# Altium PCB PCB3.PcbDoc (part 2 of 2)
Units mm, origin at the board's own origin, x right, y up, seen from the top; angles counter-clockwise.
Board outline 125 x 125 mm, 2 copper layers (Top Layer, Bottom Layer); 180 components, 111 nets, 575 pads, 155 vias.
Unrouted connection lines stored in the file: 143.
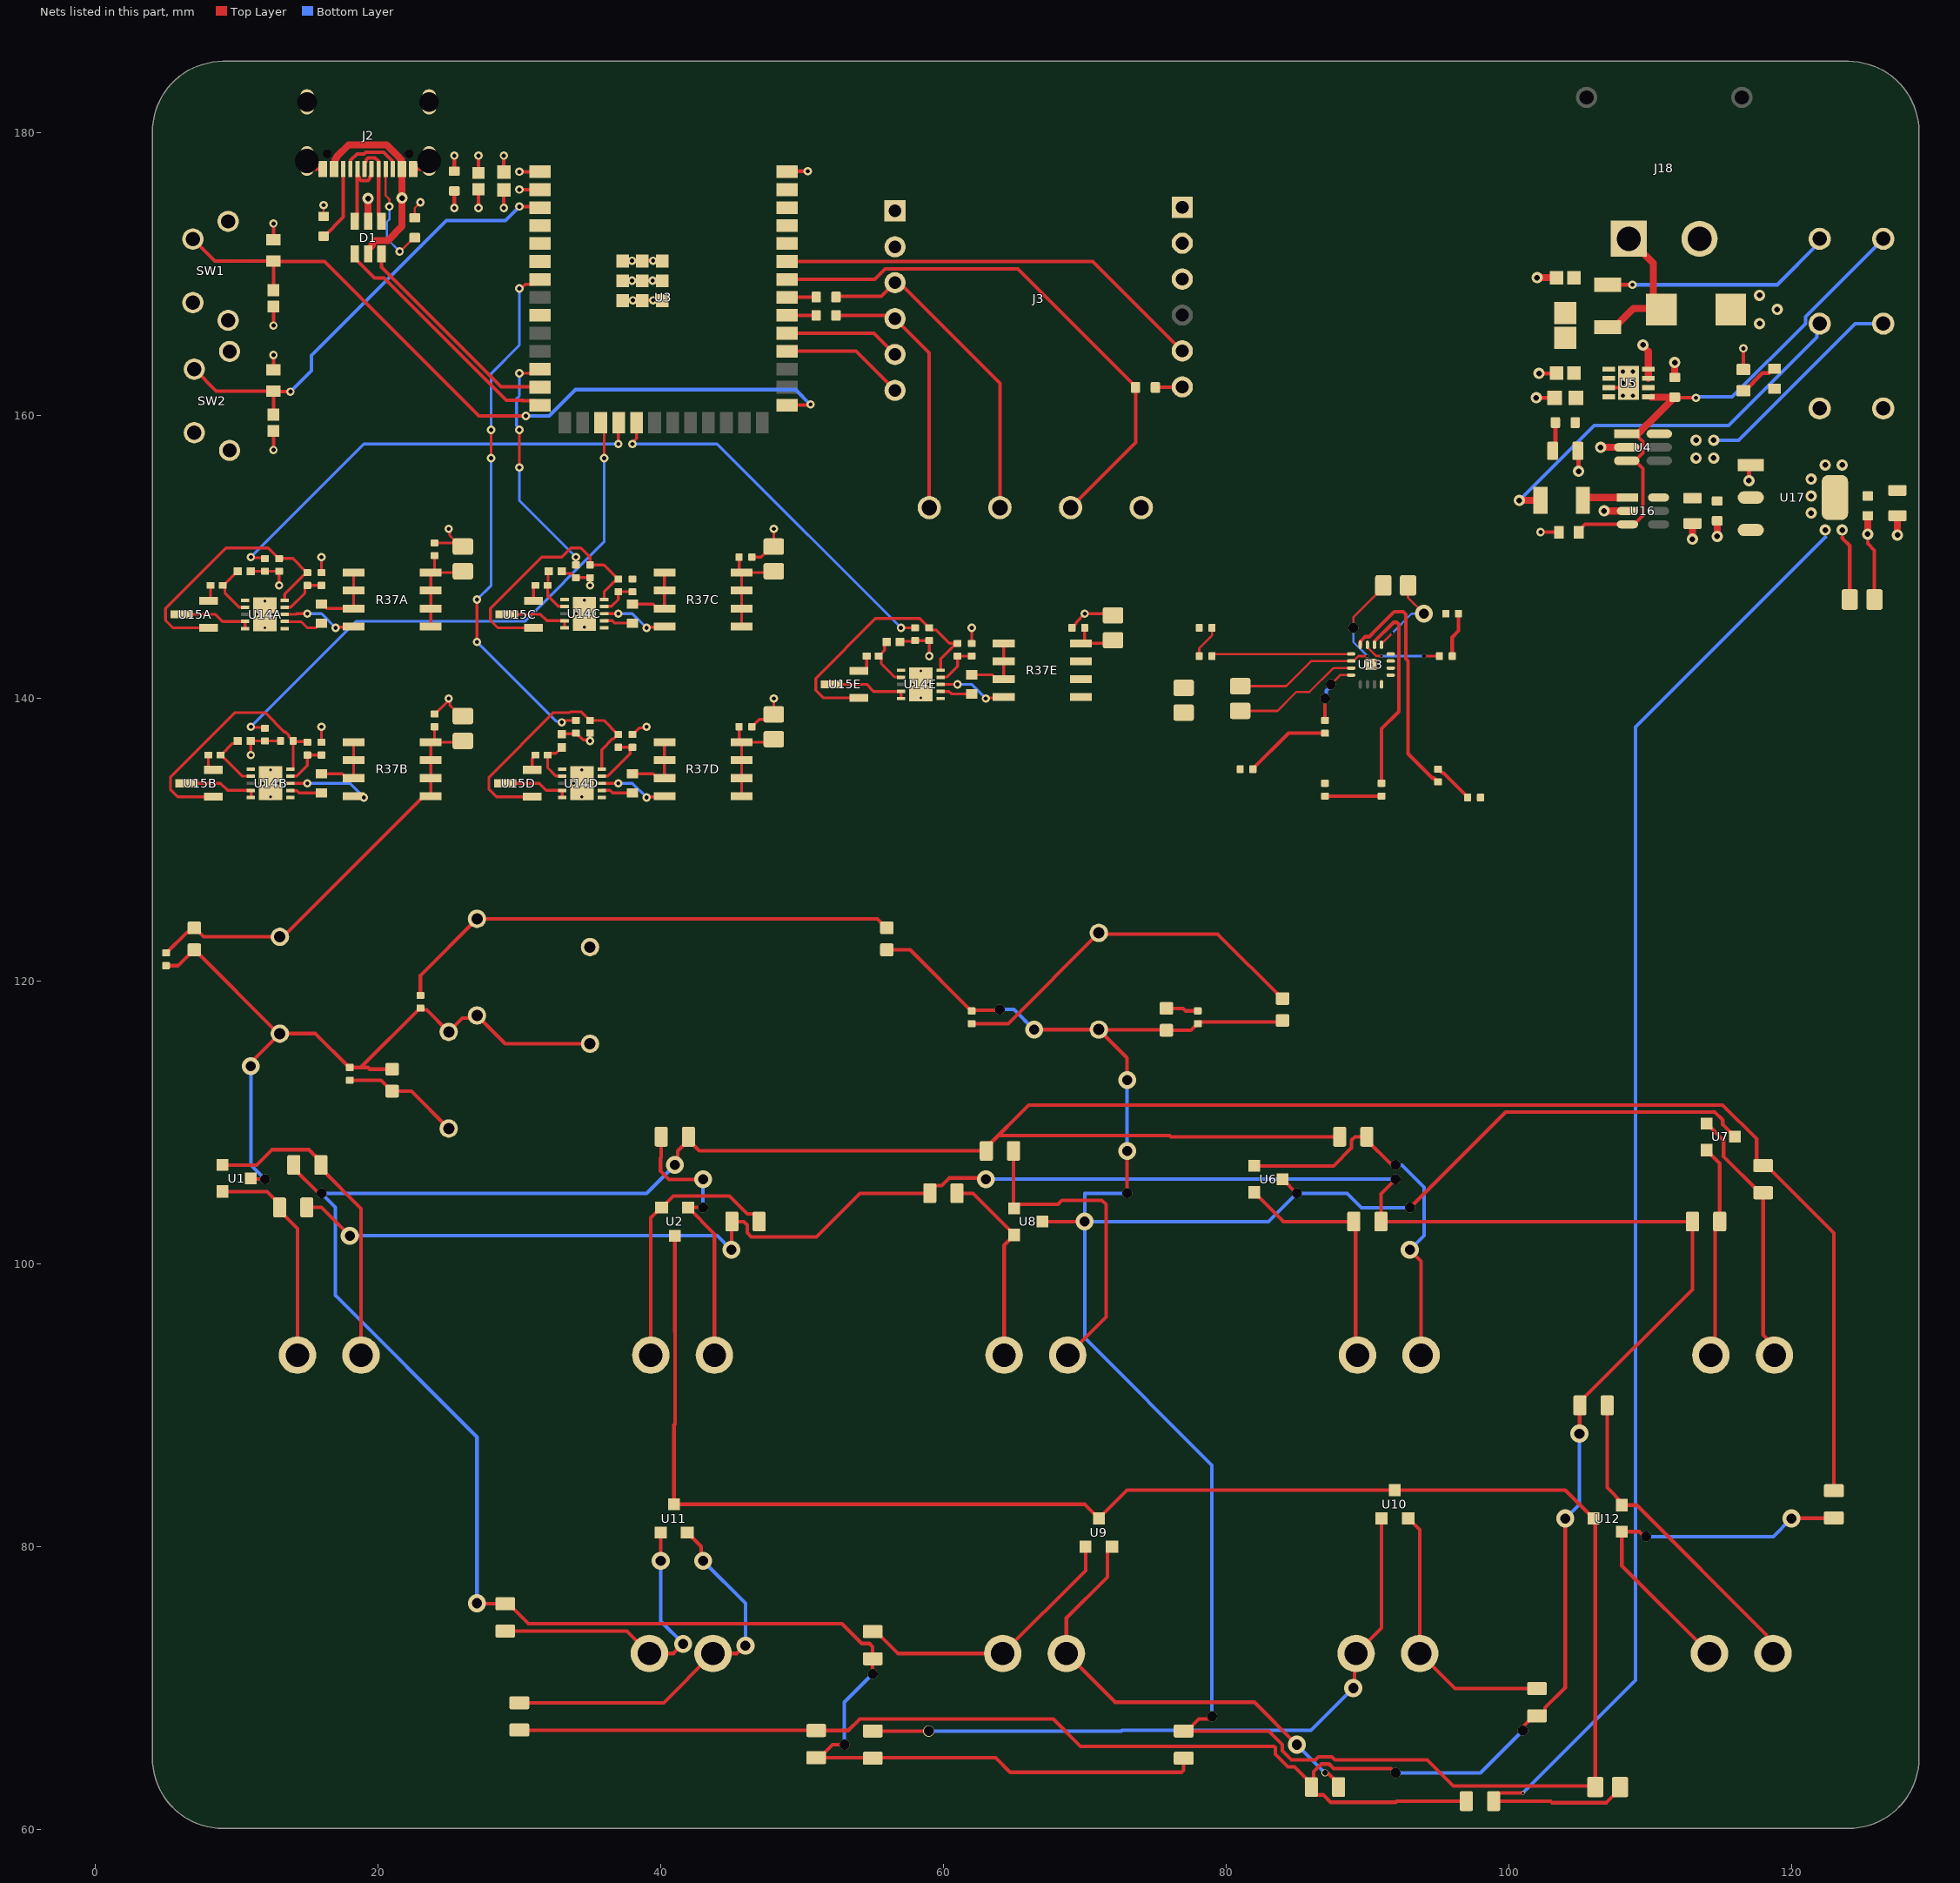
[diagram p2: the nets of this part, all layers, seen from the top]

## Part data (continued)
U17: library part CMP-00015-1, "IC LDO, 3.3V FIXED OUTPUT, 1.3V MAX DROPOUT, 1A", Case/Package=SOP, Dropout Voltage1-Max=1.3V, Dropout Voltage1-Nom=1.2V, Input Voltage Absolute-Max=18V, Max Supply Voltage=15V, Operating Temperature, TJ-Max=125°C, Operating Temperature, TJ-Min=-20°C, Output Current1-Max=800mA, Output Voltage1-Max=3.365V, Output Voltage1-Min=3.235V, Output Voltage1-Nom=3.3V, Package Body Material=Plastic, Package Shape=Rectangular, Voltage Tolerance-Max=1.97%, Adjustability=FIXED, Channels=1, Height - Seated (Max)=1.8mm, JESD-30 Code=R-PDSO-G3, JESD-609 Code=e3, Length=6.5mm, Moisture Sensitivity Level=1, Number of Outputs=1, Packaging="Tape and Reel", Pins=3, Qualification Status="Not Qualified", Reach SVHC Compliant=Yes, Regulator Type="FIXED POSITIVE SINGLE OUTPUT LDO REGULATOR", RoHS Compliant=Yes, Surface Mount=Yes, Technology=BIPOLAR, Terminal Finish=Tin, Terminal Form="Gull Wing", Terminal Pitch=2.3mm, Terminal Position=DUAL, Width=3.5mm

## Via types
v1: diameter 0.6, hole 0.3, Top Layer to Bottom Layer, 71 vias
v2: diameter 1.27, hole 0.711, Top Layer to Bottom Layer, 22 vias
v3: diameter 0.8, hole 0.4, Top Layer to Bottom Layer, 19 vias
v4: diameter 0.711, hole 0.711, Top Layer to Bottom Layer, 18 vias
v5: diameter 0.8/0.8 (per signal layer), hole 0.4, Top Layer to Bottom Layer, 11 vias
v6: diameter 0.45, hole 0.3, Top Layer to Bottom Layer, tented bottom, 6 vias
v7: diameter 0.2, hole 0.2, Top Layer to Bottom Layer, 4 vias
v8: diameter 0.3, hole 0.3, Top Layer to Bottom Layer, 1 vias
v9: diameter 0.25, hole 0.2, Top Layer to Bottom Layer, 1 vias
v10: diameter 0.5, hole 0.4, Top Layer to Bottom Layer, 1 vias
v11: diameter 0.8, hole 0.711, Top Layer to Bottom Layer, 1 vias

## Nets (pads, with @x,y where several pads share a name; then routed paths per layer and width w, separated by ;. In a path a pad name is that pad's centre, name@x,y a point inside that pad or via, vN(x,y) a via of type N, cw(c..) or ccw(c..) an arc to the next point about the centre after c; other vN are vias at no path point)
3.3V: C1.1 C2.2 C3.2 C4.2 C18.1 C31.1 C32.1 J3.10 J3.11 J20.1 R7.2 R17.2 R26.2 R48.1 U3.2 U13.16 U17.2 U17.4 | length 121.8
  Top Layer w0.25: R26.2@12.6,163.25 v1(12.6,164.3) ; R7.2@12.6,172.45 v1(12.6,173.6) ; v1(25.4,174.7) C4.2@25.4,175.9 ; v1(27.1,174.7) C3.2@27.1,176.025 ; v1(28.9,174.7) C2.2@28.9,175.975 ; v1(30,176) 31.445,176 U3.2@31.453,175.993
  Top Layer w0.254: v9(101,62.573) 99.26,62.573 98.925,62.238 R17.2@98.925,62 102.964,62 103.07,61.894 106.919,61.894 107.875,62.85 C1.1@107.875,63 ; 123.6,151.4 123.6,151.345 124.125,150.82 C18.1@124.125,147
  Bottom Layer w0.254: v9(101,62.573) 108.979,70.552 108.979,137.979 122.4,151.4
  other v5: 122.4,151.917 123.6,151.917 121.4,153.117 121.4,154.317 121.4,155.517 122.4,156.517 123.6,156.517
5V: C10.1 C30.1 J17.1 U4.6 U16.6 U17.3 | length 15.4
  Bottom Layer w0.25: v5(114.5,158.267) 116.271,158.267 124.521,166.517 J17.1@126.5,166.517
  other v5: 113.25,157.017 114.5,157.017 113.25,158.267
5V5: C7.1 C8.1 FB1.2 R11.1 U5.5 U5.8
5V5_IN: C6.1 F1.2 FB1.1 J4.1 | length 16.5
  Top Layer w0.25: F1.2@107,169.267 v1(108.75,169.267)
  Bottom Layer w0.25: v1(108.75,169.267) 119,169.267 122,172.267 J4.1@122,172.517
5V_INTER: C19.1 J21.1 R45.1 U4.1 U4.3 U5.1 U16.3 | length 37.9
  Top Layer w0.25: R45.1@104.95,151.767 104.95,151.867 105.4,152.317 108.867,152.317 109.5,152.95 109.5,156.264 U4.3@108.947,156.817 ; U4.3@108.35,156.817 U4.3@108.947,156.817 ; U4.1@108.947,158.717 109.5,158.164 109.5,157.37 U4.3@108.947,156.817 ; C19.1@111.725,161.292 113.225,161.292 v1(113.25,161.267)
  Top Layer w0.5: U4.1@108.35,158.717 109.15,158.717 109.398,158.965 109.398,158.988 109.782,159.372 109.805,159.372 C19.1@111.62,161.187 ; U5.1@110.075,161.317 C19.1@111.75,161.317 ; C19.1@111.688,161.329 C19.1@111.725,161.292
  Bottom Layer w0.25: v1(113.25,161.267) 113.317,161.334 115.809,161.334 120.99,166.514 120.99,167.007 J21.1@126.5,172.517
20mA_1: C20D.1 C23D.1 C24.2 D4.2 R37D.5 R37D.6 R37D.7 R37D.8 R40.2 U3.39 | length 9.6
  Top Layer w0.203: C20D.1@45.55,138 45.55,137.083 45.728,136.905 R37D.8@45.731,136.905 ; R37D.5@45.731,133.095 R37D.6@45.731,134.365 R37D.7@45.731,135.635 R37D.8@45.731,136.905 ; C23D.1@48,137.125 47.78,136.905 R37D.8@45.731,136.905
  Top Layer w0.254: C24.2@75.777,118.08 76.96,118.08 77.14,117.9 R40.2@78,117.9
20mA_2: C20C.1 C23C.1 C27.2 D7.2 R37C.5 R37C.6 R37C.7 R37C.8 R43.2 U3.38 | length 43.6
  Top Layer w0.203: C20C.1@45.55,150 45.55,149.083 45.728,148.905 R37C.8@45.731,148.905 ; R37C.5@45.731,145.095 R37C.6@45.731,146.365 R37C.7@45.731,147.635 R37C.8@45.731,148.905 ; C23C.1@48,149 47.905,148.905 R37C.8@45.731,148.905
  Top Layer w0.254: R43.2@23,119 23,120.42 D7.2@27,124.42 55.33,124.42 55.975,123.775 C27.2@56,123.775
20mA_3: C20B.1 C23B.1 C28.2 D8.2 R37B.5 R37B.6 R37B.7 R37B.8 R44.2 U3.4 | length 31.2
  Top Layer w0.203: R37B.5@23.731,133.095 R37B.6@23.731,134.365 R37B.7@23.731,135.635 R37B.8@23.731,136.905 ; C20B.1@24,138 24,137.083 23.822,136.905 R37B.8@23.731,136.905 ; C23B.1@26,137 25.905,136.905 R37B.8@23.731,136.905
  Top Layer w0.254: R44.2@5,122 5.025,122 6.477,123.452 6.677,123.452 C28.2@7,123.775 7.025,123.775 7.662,123.138 D8.2@13.055,123.138 13.278,123.138 23.235,133.095 R37B.5@23.731,133.095
20mA_4: C20A.1 C23A.1 C25.2 D5.2 R37A.5 R37A.6 R37A.7 R37A.8 R41.2 U3.5 | length 34
  Top Layer w0.203: R37A.5@23.731,145.095 R37A.6@23.731,146.365 R37A.7@23.731,147.635 R37A.8@23.731,148.905 25.905,148.905 C23A.1@26,149 ; R37A.8@23.822,148.905 24,149.083 C20A.1@24,150.1
  Top Layer w0.254: R41.2@62,117 64.58,117 D5.2@71,123.42 71.076,123.344 79.406,123.344 83.975,118.775 C25.2@84,118.775
20mA_5: C20E.1 C23E.1 C26.2 D6.2 R37E.5 R37E.6 R37E.7 R37E.8 R42.2 U3.6 | length 11.6
  Top Layer w0.203: C20E.1@70,145 70,143.905 71.78,143.905 C23E.1@72,144.125
  Top Layer w0.254: R42.2@18,113 20.2,113 20.975,112.225 C26.2@21,112.225 22.355,112.225 D6.2@25,109.58
24V: U14A.1 U14B.1 U14C.1 U14D.1 U14E.1
+5: C21A.1 C21B.1 C21C.1 C21D.1 C21E.1 R36A.1 R36B.1 R36C.1 R36D.1 R36E.1 U14A.5 U14B.5 U14C.5 U14D.5 U14E.5 U15A.1 U15B.1 U15C.1 U15D.1 U15E.1 | length 94.1
  Top Layer w0.203: U15A.1@8.016,145 5.491,145 4.968,145.523 4.968,146.377 9.247,150.656 12.236,150.656 12.631,150.261 12.631,150.244 12.975,149.9 C21A.1@13,149.9 13.975,149.9 14.975,148.9 R36A.1@15,148.9 14.852,148.752 14.76,148.752 13.4,147.391 U14A.5@13.4,146.95 ; U15B.1@8.362,133.05 5.838,133.05 5.314,133.573 5.314,134.427 9.888,139 12,139 13.369,137.631 13.461,137.631 13.706,137.386 13.706,137.294 13.827,137.174 13.852,137.174 14,137.025 C21B.1@14,137 ; U14B.5@13.825,135 13.982,135 14,135.018 C21B.1@14,137 ; R36B.1@15,136.9 14.95,136.95 14.05,136.95 C21B.1@14,137 ; U15D.1@30.899,133.05 28.374,133.05 27.851,133.573 27.851,134.427 32.424,139 33.559,139 33.614,139.056 34.386,139.056 34.827,138.615 34.827,138.598 34.975,138.45 35.975,138.45 R36D.1@36.975,137.45 ; U15C.1@31,145 28.475,145 27.952,145.523 27.952,146.377 31.575,150 33,150 33.656,150.656 34.345,150.656 35,150 C21C.1@35,149.45 35.975,149.45 36.975,148.45 R36C.1@37,148.45 36.852,148.302 36.76,148.302 36,147.541 U14C.5@36,147 ; U14D.5@35.825,135 35.825,136.366 36.614,137.156 36.681,137.156 R36D.1@36.975,137.45 ; R36D.1@37,137.45 R36D.1@36.975,137.45 ; U15E.1@54.016,140.05 51.491,140.05 50.968,140.573 50.968,141.427 55.197,145.655 58.336,145.655 58.63,145.361 58.63,145.344 58.975,145 C21E.1@59,145 59.148,144.852 59.469,144.852 60.421,143.9 R36E.1@61,143.9 60.852,143.752 60.76,143.752 59.8,142.791 U14E.5@59.8,142
+5V: C11.2 C12.2 U13.7 | length 9.1
  Top Layer w0.16: C12.2@81,139.125 83.632,139.125 84.968,140.461 85.9,140.461 87.589,142.15 U13.7@88.85,142.15
BOOT: C5.1 R7.1 SW1.1 U3.27 | length 53.8
  Top Layer w0.25: SW1.1@6.9,172.5 8.45,170.95 R7.1@12.6,170.95 ; C5.1@12.6,168.875 R7.1@12.6,170.95 ; v1(30.462,159.983) 27.13,159.983 16.213,170.9 12.65,170.9 R7.1@12.6,170.95 ; U3.27@48.953,160.753 50.553,160.753 v1(50.6,160.8)
  Bottom Layer w0.25: v1(30.462,159.983) 32.108,159.983 33.975,161.85 49.55,161.85 v1(50.6,160.8)
CS: J3.5 U3.31 | length 8.2
  Top Layer w0.25: U3.31@48.953,165.833 55.083,165.833 J3.5@56.58,164.335
CS_N: U3.9 U13.12
DAC_CH1: C13.2 U14D.6
DAC_CH2: C14.2 U14C.6
DAC_CH3: C15.2 U14B.6
DAC_CH4: C16.2 U14A.6
DAC_CH5: C17.2 U14E.6
EN: C29.1 R26.1 SW2.1 U3.3 | length 32.9
  Top Layer w0.25: SW2.1@7,163.3 8.55,161.75 R26.1@12.6,161.75 ; C29.1@12.6,160.075 R26.1@12.6,161.75 ; v1(13.8,161.7) 12.65,161.7 R26.1@12.6,161.75 ; v1(30,174.8) 31.375,174.8 U3.3@31.453,174.723
  Bottom Layer w0.25: v1(13.8,161.7) 15.3,163.2 15.3,164.275 24.825,173.8 29,173.8 v1(30,174.8)
GND: C1.2 C2.1 C3.1 C4.1 C5.2 C6.2 C7.2 C8.2 C9.2 C10.2 C11.1 C12.1 C18.2 C19.2 C20A.2 C20B.2 C20C.2 C20D.2 C20E.2 C21A.2 C21B.2 C21C.2 C21D.2 C21E.2 C22.2 C23A.2 C23B.2 C23C.2 C23D.2 C23E.2 C24.1 C25.1 C26.1 C27.1 C28.1 C29.2 C30.2 C31.2 C32.2 D1.2 D2.2 D3.K D4.1 D5.1 D6.1 D7.1 D8.1 J2.1 J2.2 J2.3 J2.4 J2.A1-B12 J2.B1-A12 J3.1 J3.2 J3.12 J14.1 J18.N J22.1 R8.2 R9.2 R27.2 R33A.1 R33B.1 R33C.1 R33D.1 R33E.1 R35A.2 R35B.2 R35C.2 R35D.2 R35E.2 R38A.2 R38B.2 R38C.2 R38D.2 R38E.2 R40.1 R41.1 R42.1 R43.1 R44.1 R45.2 SW1.2 SW1.G1 SW1.G2 SW2.2 SW2.G1 SW2.G2 U1.3 U2.3 U3.GND U4.2 U5.2 U5.3 U5.4 U5.6 U5.7 U5.9 U6.3 U7.3 U8.3 U9.3 U10.3 U11.3 U12.3 U13.6 U13.17 U14A.9 U14A.10 U14A.11 U14B.9 U14B.10 U14B.11 U14C.9 U14C.10 U14C.11 U14D.9 U14D.10 U14D.11 U14E.9 U14E.10 U14E.11 U15A.3 U15B.3 U15C.3 U15D.3 U15E.3 U16.2 U17.1 | length 459.3
  Top Layer w0.15: R9.2@16.15,174.1 v1(16.15,174.9) ; R8.2@22.6,174 22.6,174.7 v1(23,175.1)
  Top Layer w0.16: C12.1@81,140.875 84.257,140.875 86.032,142.65 U13.6@88.85,142.65 89.03,142.65 89.38,143 v7(90,143) ; v4(89,145) 89,145.725 91.125,147.85 C22.2@91.125,148
  Top Layer w0.203: U15A.3@6.117,145.95 8.509,145.95 9.009,145.45 U14A.9@10.6,145.45 U14A.10@10.6,144.95 ; U15B.3@7.156,134.156 7,134 8.855,134 9.355,133.5 11.025,133.5 U14B.10@11.025,133 ; v1(11,136) 11,136.992 10.992,137 R33B.1@12,137 C21B.2@13.1,137 ; R35A.2@11,149 R33A.1@12,149 C21A.2@13,149 v1(13,148) ; U14B.11@12.425,134 U14B.11@12.425,134.375 ; R38B.2@16,136.9 v1(16,138) ; R38A.2@16,148.9 v1(16,150) ; C20B.2@24,138.9 24.025,138.9 24.924,139.799 24.924,139.924 v1(25,140) 25.076,139.924 25.076,139.524 25.85,138.75 C23B.2@26,138.75 ; C20A.2@24,151 25.6,151 C23A.2@25.85,150.75 ; v1(25,152) 25.076,151.924 25.076,151.524 C23A.2@25.85,150.75 ; C23A.2@26,150.75 C23A.2@25.85,150.75 ; U15D.3@29,134 31.391,134 31.891,133.5 U14D.9@33.025,133.5 U14D.10@33.025,133 ; U15C.3@29.101,145.95 31.493,145.95 31.943,145.5 U14C.9@33.2,145.5 U14C.10@33.2,145 ; R35D.2@33,137.464 33.043,137.507 33.957,137.507 R33D.1@34,137.55 34.025,137.55 34.499,137.076 34.924,137.076 v1(35,137) C21D.2@35,137.55 ; R35C.2@33,149 33.156,148.844 33.681,148.844 33.975,148.55 R33C.1@34,148.55 C21C.2@35,148.55 v1(35,148) ; U14D.11@34.425,134 34.425,134.281 34.488,134.345 34.676,134.345 35.031,134.699 U14D.11@35.031,135 ; R38D.2@38,137.45 38.025,137.45 38.499,137.924 38.924,137.924 v1(39,138) ; C20D.2@46.45,138 46.45,138.025 46.598,138.174 46.623,138.174 46.971,138.521 47.646,138.521 C23D.2@48,138.875 v1(48,140) ; C20C.2@46.45,150 47.1,150 47.85,150.75 C23C.2@48,150.75 v1(48,152) ; U15E.3@52.117,141 54.565,141 55.065,140.5 U14E.9@57,140.5 U14E.10@57,140 ; R35E.2@56.928,144 56.978,144.05 57.95,144.05 R33E.1@58,144.1 C21E.2@59,144.1 v1@59,143.1 ; R38E.2@62,143.9 v1(62,145) ; C20E.2@69.1,145 69.1,145.025 69.394,145.319 69.394,145.394 v1(70,146) 71.875,146 C23E.2@72,145.875
  Top Layer w0.25: v1(12.6,157.58) C29.2@12.6,158.925 ; v1(12.6,166.38) C5.2@12.6,167.725 ; J2.2@14.975,178.02 14.975,177.791 15.321,177.445 J2.B1-A12@16.095,177.445 J2.B1-A12@16.097,177.443 ; R9.2@16.125,174.125 R9.2@16.15,174.1 ; J2.A1-B12@22.548,177.392 J2.A1-B12@22.495,177.445 23.269,177.445 23.615,177.791 J2.1@23.615,178.02 ; C4.1@25.4,177.3 v1(25.4,178.4) ; C3.1@27.1,177.175 v1(27.1,178.4) ; C2.1@28.9,177.225 v1(28.9,178.4) ; v1(30.003,177.263) U3.GND@31.453,177.263 ; U3.GND@37.303,168.143 37.325,168.165 v1(38.035,168.165) ; U3.GND@37.303,169.543 37.325,169.565 v1(37.965,169.565) ; U3.GND@37.303,170.943 37.325,170.965 v1(37.965,170.965) ; U3.GND@38.703,168.143 38.725,168.165 v1(39.465,168.165) ; U3.GND@38.703,169.543 38.725,169.565 v1(39.435,169.565) ; U3.GND@38.703,170.943 38.725,170.965 v1(39.465,170.965) ; U3.GND@48.953,177.263 48.99,177.3 v1(50.4,177.3) ; v1(102.25,151.767) R45.2@103.55,151.767 ; U5.7@107.085,161.992 107.86,161.992 108.08,162.212 v6(108.08,162.317) ; D3.K@116.6,163.267 v1(116.6,164.767)
  Top Layer w0.254: R44.1@5,121.1 5.85,121.1 6.975,122.225 C28.1@7,122.225 7.025,122.225 12.952,116.298 D8.1@13.055,116.298 ; U1.3@11,106.06 11.06,106 v4(12,106) ; v2@11,114.243 D8.1@13.055,116.298 ; C26.1@21,113.775 19.401,113.775 19.276,113.9 18.775,113.9 ; D4.1@35,115.58 29,115.58 D7.1@27,117.58 26.809,117.389 25.969,117.389 D6.1@25,116.42 23.443,117.977 23.123,117.977 R43.1@23,118.1 22.975,118.1 18.775,113.9 ; U2.3@41,102 41,95.198 41.006,95.192 41.006,88.683 40.94,88.617 U11.3@40.94,83 70,83 U9.3@71,82 73,84 U10.3@91.94,84 104,84 U12.3@106,82 106.125,81.875 C1.2@106.125,63 106.044,63.081 96.08,63.081 94.231,64.931 87.706,64.931 87.498,65.139 86.528,65.139 86.32,64.931 84.633,64.931 83.984,65.579 83.984,66.009 83.031,66.963 R27.2@77.238,66.963 ; C27.1@56,122.225 57.65,122.225 61.975,117.9 R41.1@62,117.9 62.05,117.95 63.95,117.95 v4(64,118) ; v2(66.42,116.58) D5.1@71,116.58 ; U8.3@67,103 v2(70,103) ; v4(73,105) v2(73,108) ; v2(73,113) 73,114.58 D5.1@71,116.58 ; R27.2@77,66.963 R27.2@77.238,66.963 ; v4(79,68) 78.806,67.806 78.081,67.806 R27.2@77.238,66.963 ; U6.3@84,106 v4(85,105) ; C25.1@84,117.225 83.888,117.113 78.113,117.113 R40.1@78,117 77.975,117 77.505,116.53 C24.1@75.777,116.53 75.752,116.555 71.025,116.555 D5.1@71,116.58 ; v4(93,104) 93.042,104 99.783,110.741 114.578,110.741 115.142,110.176 115.142,109.858 U7.3@116,109 ; 125.403,151.109 125.403,150.961 125.875,150.489 C18.2@125.875,147 ; D8.1@13.055,116.298 15.577,116.298 17.975,113.9 18.775,113.9
  Top Layer w0.3: v3(101.95,161.267) C8.2@103.25,161.267 ; v3(102.15,162.992) 103.35,162.992 C7.2@103.375,163.017 ; C9.2@104.89,157.517 104.945,157.462 v3(104.945,156.072) ; D2.2@115.7,167.517 D2.2@115.8,167.417 ; v3(117,155.417) 117,156.393 U17.1@117.124,156.517
  Top Layer w0.5: D1.2@19.3,173.75 v3(19.3,175.375) ; v3(102,169.767) C6.2@103.375,169.767 ; v3(106.5,157.767) U4.2@108.35,157.767 ; v3(106.75,153.267) U16.2@108.4,153.267 ; v3(109.5,165.017) 109.5,164.936 109.875,164.561 U5.4@109.875,163.292 U5.3@109.875,162.642 ; C19.2@111.75,162.717 v3(111.75,163.767) ; v3(113,151.267) C10.2@113,152.377 ; v3(114.75,151.467) C30.2@114.75,152.567 ; v3(125.403,151.626) C31.2@125.403,152.926 ; v3(127.5,151.567) C32.2@127.5,152.927
  Bottom Layer w0.16: v4(89,145) 89,144 v7(90,143)
  Bottom Layer w0.254: v2(11,114) 11,107 v4(12,106) ; v4(64,118) 65,118 v2(66.42,116.58) ; v4(73,105) 70,105 v2(70,103) ; v2(73,108) v2(73,113) ; v4(79,68) 79,85.763 70,94.763 v2(70,103) ; v4@93,103.984 89.57,103.984 88.554,105 v4(85,105) 83,103 v2(70,103)
  other v1: 59,143
  other v3: 117.75,166.517 119,167.517 117.75,168.517
  other v6: 108.08,161.417 108.78,161.417 108.78,162.317 108.08,163.117 108.78,163.117
GPIO07: R33D.2 U3.7 | length 37.4
  Top Layer w0.203: v1(27,144) v1(27,147) ; v1(28,157) v1(28,159) ; v1(30,169) 30.107,169 30.401,169.294 31.104,169.294 U3.7@31.453,169.643 ; v1(33,138.312) 33.107,138.312 33.246,138.45 R33D.2@34,138.45
  Bottom Layer w0.203: v1(27,144) 32.612,138.388 32.924,138.388 v1(33,138.312) ; v1(27,147) 28,148 v1(28,157) ; v1(28,159) 28,163 30,165 v1(30,169)
GPIO08: R33C.2 U3.12 | length 16.9
  Top Layer w0.203: v1(30,156.345) v1(30,159) ; v1(30,163) 31.16,163 U3.12@31.453,163.293 ; R33C.2@34,149.45 v1(34,150)
  Bottom Layer w0.203: v1(30,156.345) 30,154 v1(34,150) ; v1(30,159) 30,159.107 29.807,159.301 29.807,161.205 30,161.399 v1(30,163)
GPIO09: R33B.2 U3.17 | length 40
  Top Layer w0.203: v1(11,138) 11.05,137.95 11.95,137.95 R33B.2@12,137.9 ; U3.17@35.758,159.503 36,159.26 v1(36,157)
  Bottom Layer w0.203: v1(11,138) 18.457,145.457 30.384,145.457 36,151.073 v1(36,157)
GPIO10: R33A.2 U3.18 | length 31.9
  Top Layer w0.203: v1(11,150) 11.05,149.95 11.95,149.95 R33A.2@12,149.9 ; v1(37,158) 37,159.475 U3.18@37.028,159.503
  Bottom Layer w0.203: v1(11,150) 19,158 v1(37,158)
GPIO11: R33E.2 U3.19 | length 27
  Top Layer w0.203: v1(38,158) 38,158.107 38.298,158.405 U3.19@38.298,159.503 ; v1(57,145) R33E.2@58,145
  Bottom Layer w0.203: v1(38,158) 44,158 v1(57,145)
INT: J3.6 U3.30 | length 8.8
  Top Layer w0.25: U3.30@48.953,164.563 53.813,164.563 J3.6@56.58,161.795
MISO: J15.1 R47.2 U3.34 U13.15 | length 38.9
  Top Layer w0.25: U3.34@48.953,169.643 55.143,169.643 55.89,170.39 65.26,170.39 73.6,162.05 R47.2@73.6,162 73.6,158.1 J15.1@69,153.5
MOSI: J3.3 J13.1 R46.1 U13.14 | length 23.8
  Top Layer w0.25: R46.1@52.4,168.4 52.45,168.45 55.615,168.45 J3.3@56.58,169.415 56.885,169.415 64,162.3 J13.1@64,153.5
NetC9_1: C9.1 R11.2 | length 2.1
  Top Layer w0.3: C9.1@103.1,157.517 103.3,157.717 R11.2@103.3,159.517
NetC13_1: C13.1 R28.2 | length 4
  Top Layer w0.254: C13.1@87,133.1 90.9,133.1 R28.2@90.95,133.05
NetC14_1: C14.1 R29.2 | length 3.2
  Top Layer w0.254: R29.2@96,143 96,144.337 96.45,144.787 C14.1@96.45,146
NetC15_1: C15.1 R30.2 | length 2.9
  Top Layer w0.254: R30.2@95,135 95.025,135 95.294,134.731 95.396,134.731 96.977,133.15 96.977,133.123 C15.1@97.1,133
NetC16_1: C16.1 R31.2 | length 2.4
  Top Layer w0.16: R31.2@78.1,143 78.1,143.55 79,144.45 C16.1@79,145
NetC17_1: C17.1 R32.2 | length 6.2
  Top Layer w0.254: C17.1@81.9,135 81.9,135.025 84.425,137.55 R32.2@87,137.55
NetC22_1: C22.1 U13.1 | length 6.4
  Top Layer w0.16: U13.1@91,143.8 91,143.875 v7(91.756,144.631) ; C22.1@92.875,148 92.875,147.125 v2(94,146)
  Bottom Layer w0.16: v7(91.756,144.631) 93.125,146 v2(94,146)
NetCR1_1: U3.36
NetCR1_4: U3.37
NetD2_1: D2.1 F1.1 J18.P | length 10
  Top Layer w0.5: F1.1@107,166.267 107.25,166.517 107.75,166.517 108.813,167.58 D2.1@110.5,167.58 ; J18.P@108.5,172.517 110.229,170.787 110.229,168.087 110.619,167.698 D2.1@110.8,167.517
NetD3_A: D3.A R48.2 | length 2.8
  Top Layer w0.3: D3.A@116.6,161.767 116.7,161.767 117.95,163.017 118.4,163.017 118.7,163.317 R48.2@118.8,163.317
NetF2_2: F2.2 U16.1 | length 3.2
  Top Layer w0.5: F2.2@105.25,154.017 105.45,154.217 U16.1@108.4,154.217
NetJ1_1: J1.1 R1.2 U1.2 | length 15.6
  Top Layer w0.254: U1.2@9,105.12 12.155,105.12 13.037,104.238 R1.2@13.037,104 13.037,103.763 14.3,102.5 J1.1@14.3,93.55
NetJ1_2: J1.2 R4.2 U1.1 | length 22.6
  Top Layer w0.254: U1.1@9,107 11.401,107 12.482,108.081 15.119,108.081 15.963,107.237 R4.2@15.963,107 15.963,106.762 18.8,103.925 J1.2@18.8,93.55
NetJ2_A5: J2.A5 R8.1 | length 7.8
  Top Layer w0.15: J2.A5@20.545,177.445 20.545,175.577 20.8,175.322 v1(20.8,174.8) ; v1(21.525,171.625) 21.571,171.625 22.546,172.6 R8.1@22.6,172.6
  Bottom Layer w0.15: v1(20.8,174.8) 20.8,173.889 20.625,173.714 20.625,172.525 v1(21.525,171.625)
NetJ2_B5: J2.B5 R9.1 | length 5.4
  Top Layer w0.25: R9.1@16.15,172.7 16.2,172.7 17.545,174.045 J2.B5@17.545,177.445
NetJ3_7: J3.7 R47.1 | length 1.9
  Top Layer w0.25: R47.1@75,162 75.023,162.022 76.877,162.022 J3.7@76.9,162.045
NetJ5_1: J5.1 R2.2 U2.2 | length 18.9
  Top Layer w0.254: J5.1@39.3,93.55 39.3,103.27 40.03,104 U2.2@40.06,104 40.09,104 40.891,104.801 44.87,104.801 46.119,103.552 46.627,103.552 46.962,103.217 R2.2@46.962,103
NetJ5_2: J5.2 R5.2 U2.1 | length 20
  Top Layer w0.254: R5.2@40.037,109 40.037,107.53 39.984,107.476 39.984,106.579 40.579,105.984 42.984,105.984 v2(43,106) ; v4(43,104) U2.1@41.94,104 43.8,102.14 J5.2@43.8,93.55
  Bottom Layer w0.254: v4(43,104) 42.984,104.016 42.984,105.984 v2(43,106)
NetJ6_1: J6.1 R3.2 U8.2 | length 14.1
  Top Layer w0.254: R3.2@60.962,105 62.09,105 65,102.09 U8.2@65,102.06 65,102.03 64.3,101.33 J6.1@64.3,93.55
NetJ6_2: J6.2 R6.2 U8.1 | length 22.7
  Top Layer w0.254: R6.2@64.962,108 64.962,103.978 U8.1@65,103.94 65.293,104.233 68.114,104.233 68.389,104.508 71.21,104.508 71.508,104.21 71.508,96.258 J6.2@68.8,93.55
NetJ7_1: J7.1 R12.2 U6.2 | length 17.5
  Top Layer w0.254: U6.2@82,105.06 82,105.03 82.293,104.737 82.323,104.737 84.06,103 R12.2@89.038,103 89.169,102.869 89.169,93.681 J7.1@89.3,93.55
NetJ7_2: J7.2 R15.2 U6.1 | length 27.4
  Top Layer w0.254: U6.1@82,106.94 87.611,106.94 88.881,108.21 88.881,108.762 89.119,109 R15.2@89.962,109 89.962,108.763 91.638,107.087 91.913,107.087 v4(92,107) ; v2(93,101) 93.8,100.2 J7.2@93.8,93.55
  Bottom Layer w0.254: v4(92,107) 92.437,107 94.016,105.421 94.016,102.016 v2(93,101)
NetJ8_1: J8.1 R13.2 U7.2 | length 15.2
  Top Layer w0.254: U7.2@114,108.06 114,108.03 114.925,107.105 R13.2@114.925,103 114.612,102.687 114.612,93.862 J8.1@114.3,93.55
NetJ8_2: J8.2 R16.2 U7.1 | length 18.5
  Top Layer w0.254: U7.1@114,109.94 115.199,108.741 115.199,107.601 117.763,105.037 R16.2@118,105.037 118,94.998 118.8,94.198 J8.2@118.8,93.55
NetJ9_1: J9.1 R14.2 U12.2 | length 23
  Top Layer w0.254: R14.2@106.962,90 106.962,84.188 U12.2@108.09,83.06 ; U12.2@108,82.94 108.09,82.94 109.06,82.94 118.242,73.758 118.242,72.908 J9.1@118.7,72.45
NetJ9_2: J9.2 R25.2 U12.1 | length 26.9
  Top Layer w0.254: v4(109.716,80.716) 109.592,80.716 109.248,81.06 U12.1@108,81.06 108,78.65 J9.2@114.2,72.45 ; v2(120,82) 120.019,82.019 122.981,82.019 R25.2@123,82.037
  Bottom Layer w0.254: v4(109.716,80.716) 118.716,80.716 v2(120,82)
NetJ10_1: J10.1 R18.2 U10.2 | length 19.2
  Top Layer w0.254: U10.2@92.88,82 92.91,82 93.7,81.21 J10.1@93.7,72.45 96.188,69.962 R18.2@102,69.962
NetJ10_2: J10.2 R22.2 U10.1 | length 48.1
  Top Layer w0.254: R22.2@55,66.963 v11(58.962,66.963) v11@59,67 ; v2(89,70) 89.1,70.1 89.1,72.35 J10.2@89.2,72.45 91,74.25 U10.1@91,82
  Bottom Layer w0.254: v11(58.962,66.963) 72.589,66.963 72.642,67.016 86.016,67.016 v2(89,70)
NetJ11_1: J11.1 R19.2 U9.2 | length 32.2
  Top Layer w0.254: U9.2@71.94,80 71.91,80 71.617,79.707 71.617,77.861 68.7,74.944 J11.1@68.7,72.45 72.15,69 82,69 v2(85,66) ; v10(87,64) 87.047,63.953 87.247,63.953 87.963,63.238 R19.2@87.963,63
  Bottom Layer w0.254: v2(85,66) v10(87,64)
NetJ11_2: J11.2 R23.2 U9.1 | length 19.8
  Top Layer w0.254: R23.2@55,74 55.237,74 56.787,72.45 J11.2@64.2,72.45 70.06,78.31 U9.1@70.06,80
NetJ12_1: J12.1 R20.2 U11.2 | length 27.4
  Top Layer w0.254: R20.2@30,68.963 40.213,68.963 J12.1@43.7,72.45 45.382,72.45 45.932,73 v2(46,73) ; U11.2@41.88,81 41.91,81 42.203,80.707 42.203,80.677 42.864,80.016 42.864,79.136 v2(43,79)
  Bottom Layer w0.254: v2(43,79) 46,76 v2(46,73)
NetJ12_2: J12.2 R24.2 U11.1 | length 22.3
  Top Layer w0.254: R24.2@29,74.037 37.613,74.037 J12.2@39.2,72.45 40.906,72.45 v2@41.588,73.132 ; v2(40,79) U11.1@40,81 ; v2@41.319,73.132 v2@41.588,73.132 ; v2(41.594,73.132) v2@41.588,73.132
  Bottom Layer w0.254: v2(40,79) 40,74.725 v2(41.594,73.132)
NetR10_2: R10.2 U3.32 | length 2
  Top Layer w0.25: U3.32@48.953,167.103 48.955,167.1 R10.2@51,167.1
NetR28_1: R28.1 U13.2 | length 14.3
  Top Layer w0.254: U13.2@90.5,143.8 90.507,143.807 90.507,144.034 91.858,145.385 92.068,145.385 92.217,145.236 92.217,139.075 91,137.858 R28.1@91,134
NetR29_1: R29.1 U13.3 | length 5.5
  Top Layer w0.16: U13.3@90,143.8 90,143.62 90.6,143.02 90.741,143.02 90.761,143 v7(91,143) ; v8(94,143) R29.1@95.1,143
  Bottom Layer w0.16: v7(91,143) v8(94,143)
NetR30_1: R30.1 U13.4 | length 17.3
  Top Layer w0.254: U13.4@89.5,143.8 89.507,143.807 89.507,144.034 89.84,144.367 90.121,144.367 90.629,144.875 91.901,146.147 92.533,146.147 92.725,145.955 92.725,143.521 92.725,142.802 92.882,142.645 92.882,136.091 94.604,134.369 94.706,134.369 94.975,134.1 R30.1@95,134.1
NetR31_1: R31.1 U13.5 | length 9.9
  Top Layer w0.16: R31.1@79,143 79.135,143.135 88.835,143.135 U13.5@88.85,143.15
NetR32_1: R32.1 U13.8 | length 4.4
  Top Layer w0.16: v4(87.414,141) 88.064,141.65 U13.8@88.85,141.65
  Top Layer w0.254: R32.1@87,138.45 v4(87,140)
  Bottom Layer w0.254: v4(87,140) 87.087,140.087 87.087,140.55 87.414,140.876 v4(87.414,141)
NetR34A_1: R34A.1 U14A.2 | length 2.9
  Top Layer w0.203: U14A.2@13.4,145.45 13.418,145.431 14.569,145.431 15,145 15.6,145 15.923,145.323 R34A.1@16,145.323
NetR34A_2: R34A.2 R37A.1 R37A.2 R37A.3 | length 4.9
  Top Layer w0.203: R34A.2@16,146.677 16.077,146.677 16.388,146.365 R37A.3@18.27,146.365 R37A.2@18.27,147.635 R37A.1@18.27,148.905
NetR34B_1: R34B.1 U14B.2 | length 2.2
  Top Layer w0.203: U14B.2@13.825,133.5 13.843,133.482 14.223,133.482 14.229,133.476 14.272,133.476 14.424,133.323 R34B.1@16,133.323
NetR34B_2: R34B.2 R37B.1 R37B.2 R37B.3 | length 4.9
  Top Layer w0.203: R34B.2@16,134.677 17.462,134.677 17.774,134.365 R37B.3@18.27,134.365 R37B.2@18.27,135.635 R37B.1@18.27,136.905
NetR34C_1: R34C.1 U14C.2 | length 2.1
  Top Layer w0.203: U14C.2@36,145.5 36.573,145.5 36.728,145.344 37.979,145.344 R34C.1@38,145.323
NetR34C_2: R34C.2 R37C.1 R37C.2 R37C.3 | length 4.9
  Top Layer w0.203: R34C.2@38,146.677 39.462,146.677 39.774,146.365 R37C.3@40.27,146.365 R37C.2@40.27,147.635 R37C.1@40.27,148.905
NetR34D_1: R34D.1 U14D.2 | length 2.2
  Top Layer w0.203: U14D.2@35.825,133.5 36.429,133.5 36.606,133.323 R34D.1@38,133.323
NetR34D_2: R34D.2 R37D.1 R37D.2 R37D.3 | length 4.9
  Top Layer w0.203: R34D.2@38,134.677 39.462,134.677 39.774,134.365 R37D.3@40.27,134.365 R37D.2@40.27,135.635 R37D.1@40.27,136.905
NetR34E_1: R34E.1 U14E.2 | length 2.3
  Top Layer w0.203: U14E.2@59.8,140.5 60.404,140.5 60.581,140.323 R34E.1@62,140.323
NetR34E_2: R34E.2 R37E.1 R37E.2 R37E.3 | length 4.9
  Top Layer w0.203: R34E.2@62,141.677 63.462,141.677 63.774,141.365 R37E.3@64.269,141.365 R37E.2@64.269,142.635 R37E.1@64.269,143.905
NetR35A_1: R35A.1 R39A.2 U14A.7 | length 3.9
  Top Layer w0.203: R39A.2@9,148 9.033,148 9.168,147.865 9.168,147.459 10.159,146.468 10.582,146.468 U14A.7@10.6,146.45 ; R39A.2@9.044,148 9.859,148.815 9.887,148.815 R35A.1@10.072,149
NetR35B_1: R35B.1 R39B.2 U14B.7 | length 4.4
  Top Layer w0.203: R39B.2@8.852,136 R39B.2@8.896,136 ; R35B.1@10.072,137 9.887,136.815 9.711,136.815 R39B.2@8.896,136 ; U14B.7@11.025,134.5 10.396,134.5 R39B.2@8.896,136
NetR35C_1: R35C.1 R39C.2 U14C.7 | length 3.3
  Top Layer w0.203: R35C.1@32.072,149 32.036,148.964 32.036,148.036 R39C.2@32,148 32,147.545 32.016,147.529 32.016,147.261 32.759,146.518 33.182,146.518 U14C.7@33.2,146.5
NetR35D_1: R35D.1 R39D.2 U14D.7 | length 3.4
  Top Layer w0.203: R35D.1@33,136.536 33,136.528 32.584,136.113 32.113,136.113 R39D.2@32,136 32,135.102 32.584,134.518 33.007,134.518 U14D.7@33.025,134.5
NetR35E_1: R35E.1 R39E.2 U14E.7 | length 3.6
  Top Layer w0.203: R39E.2@55.426,143 R39E.2@55.47,143 ; R35E.1@56,144 55.836,143.836 55.836,143.409 55.605,143.178 55.605,143.135 R39E.2@55.47,143 ; U14E.7@57,141.5 56.981,141.518 56.559,141.518 55.605,142.473 55.605,142.865 R39E.2@55.47,143
NetR36A_2: R36A.2 R38A.1 U14A.4 | length 3.5
  Top Layer w0.203: U14A.4@13.4,146.45 13.418,146.468 13.841,146.468 14.827,147.454 14.827,147.852 14.975,148 R36A.2@15,148 R38A.1@16,148
NetR36B_2: R36B.2 R38B.1 U14B.4 | length 3.2
  Top Layer w0.203: U14B.4@13.825,134.5 13.843,134.518 14.266,134.518 15,135.252 R36B.2@15,136 R38B.1@16,136
NetR36C_2: R36C.2 R38C.1 U14C.4 | length 2.8
  Top Layer w0.203: U14C.4@36,146.5 36.018,146.518 36.518,146.518 37,147 R36C.2@37,147.55 R38C.1@38,147.55
NetR36D_2: R36D.2 R38D.1 U14D.4 | length 4.2
  Top Layer w0.203: U14D.4@35.825,134.5 35.843,134.518 36.266,134.518 37.827,136.079 37.827,136.402 37.975,136.55 R38D.1@38,136.55 R36D.2@37,136.55
NetR36E_2: R36E.2 R38E.1 U14E.4 | length 3.2
  Top Layer w0.203: U14E.4@59.8,141.5 59.818,141.518 60.241,141.518 61,142.277 R36E.2@61,143 R38E.1@62,143
NetR37A_4: R37A.4 U14A.3 | length 5.3
  Top Layer w0.203: U14A.3@13.4,145.95 14.173,145.95 14.223,146 v1(15,146) ; v1(17,145) 17.047,145.048 18.222,145.048 R37A.4@18.27,145.095
  Bottom Layer w0.203: v1(15,146) 16,146 v1(17,145)
NetR37B_4: R37B.4 U14B.3 | length 6.4
  Top Layer w0.203: U14B.3@13.825,134 v1(15,134) ; R37B.4@18.27,133.095 18.905,133.095 v1(19,133)
  Bottom Layer w0.203: v1(15,134) 18,134 v1(19,133)
NetR37C_4: R37C.4 U14C.3 | length 4.7
  Top Layer w0.203: U14C.3@36,146 v1(37,146) ; v1(39,145) 39.048,145.048 40.222,145.048 R37C.4@40.27,145.095
  Bottom Layer w0.203: v1(37,146) 38,146 v1(39,145)
NetR37D_4: R37D.4 U14D.3 | length 4.9
  Top Layer w0.203: U14D.3@35.825,134 v1(37,134) ; v1(39,133) 39.048,133.048 40.222,133.048 R37D.4@40.27,133.095
  Bottom Layer w0.203: v1(37,134) 38,134 v1(39,133)
NetR37E_4: R37E.4 U14E.3 | length 4.9
  Top Layer w0.203: U14E.3@59.8,141 v1(61,141) ; v1(63,140) 63.048,140.047 64.222,140.047 R37E.4@64.269,140.095
  Bottom Layer w0.203: v1(61,141) 62,141 v1(63,140)
NetR39A_1: R39A.1 U15A.2 | length 1.2
  Top Layer w0.203: U15A.2@8.016,146.9 8.148,147.031 R39A.1@8.148,148
NetR39B_1: R39B.1 U15B.2 | length 1.3
  Top Layer w0.203: R39B.1@8,136 8,135.128 8.178,134.95 U15B.2@8.362,134.95
NetR39C_1: R39C.1 U15C.2 | length 1.2
  Top Layer w0.203: U15C.2@31,146.9 31,147.865 31.135,148 R39C.1@31.148,148
NetR39D_1: R39D.1 U15D.2 | length 1.2
  Top Layer w0.203: U15D.2@30.899,134.95 30.899,135.751 30.969,135.822 30.969,135.865 31.104,136 R39D.1@31.148,136
NetR39E_1: R39E.1 U15E.2 | length 1.6
  Top Layer w0.203: U15E.2@54.016,141.95 54.397,141.95 54.575,142.128 54.575,142.784 R39E.1@54.791,143
NetR46_2: R46.2 U3.33 | length 2.1
  Top Layer w0.25: U3.33@48.953,168.373 48.98,168.4 R46.2@51,168.4
RS485_A: R1.1 R2.1 R3.1 R12.1 R13.1 R14.1 R17.1 R18.1 R19.1 R20.1 R21.1 | length 237.7
  Top Layer w0.254: R1.1@14.962,104 16,104 v2(18,102) ; R20.1@30,67.038 30.019,67.019 50.981,67.019 R21.1@51,67 53.279,67 54.085,67.806 67.777,67.806 69.702,65.881 83.394,65.881 83.476,65.799 83.476,65.315 84.369,64.423 84.853,64.423 86.038,63.238 R19.1@86.038,63 ; v2(45,101) 45.019,101.019 45.019,102.981 R2.1@45.037,103 45.881,103 46.119,102.762 46.119,102.21 46.41,101.919 51.015,101.919 54.096,105 R3.1@59.037,105 59.037,105.217 59.373,105.552 59.881,105.552 60.41,106.081 62.919,106.081 v2(63,106) ; v4(92,64) 91.685,64.315 87.603,64.315 87.287,64.631 86.739,64.631 86.189,64.081 86.189,63.151 R19.1@86.038,63 ; v4(92,106) 90.963,104.963 R12.1@90.963,103 R13.1@113,103 113,98.2 105.037,90.238 R14.1@105.037,90 105.019,89.981 105.019,88.019 v2(105,88) ; R17.1@97,62 92.078,62 91.997,61.919 87.41,61.919 86.881,62.448 86.373,62.448 86.038,62.783 R19.1@86.038,63 ; v4(101,67) 101.087,67.087 101.087,67.362 101.762,68.037 R18.1@102,68.037 102.237,68.037 102.573,68.373 102.573,68.611 104,70.038 v2(104,82)
  Bottom Layer w0.254: v2(18,102) 44,102 v2(45,101) ; v2(63,106) v4(92,106) ; v4(92,64) 98,64 v4(101,67) ; v2(104,82) 105,83 v2(105,88)
RS485_B: R4.1 R5.1 R6.1 R15.1 R16.1 R21.2 R22.1 R23.1 R24.1 R25.1 R27.1 | length 261.1
  Top Layer w0.254: R4.1@14.038,107 14.038,106.762 15.713,105.087 15.913,105.087 v4(16,105) ; v2(27,76) 27.019,75.981 28.981,75.981 R24.1@29,75.962 29.238,75.962 30.655,74.545 52.821,74.545 54.21,73.156 54.762,73.156 55,72.919 R23.1@55,72.075 v4(55,71) ; v2(41,107) 41.194,107.194 41.194,107.994 R5.1@41.962,108.763 ; R5.1@41.962,109 R5.1@41.962,108.763 ; R21.2@51,65.075 R21.2@51.237,65.075 ; v4(53,66) 52.162,66 R21.2@51.237,65.075 ; 63.881,109.081 76.015,109.081 76.096,109 R15.1@88.037,109 ; R27.1@77,65.038 77,64.194 76.851,64.045 64.727,64.045 63.697,65.075 R21.2@51.237,65.075 ; R25.1@123,83.962 123,102.2 118.238,106.962 R16.1@118,106.962 117.878,106.962 117.543,107.298 117.543,108.836 115.13,111.249 66.049,111.249 63.037,108.238 R6.1@63.037,108 42.725,108 R5.1@41.962,108.763
  Bottom Layer w0.254: v2(27,76) 27,87.763 16.984,97.779 16.984,104.016 v4(16,105) 39,105 v2(41,107) ; v4(53,66) 53,69 v4(55,71)
RST: J3.8 U3.35 | length 30.6
  Top Layer w0.25: U3.35@48.953,170.913 70.573,170.913 J3.8@76.9,164.585
SBU: J2.A8 J2.B8 | length 4.7
  Top Layer w0.25: J2.A8@18.045,177.445 18.07,177.47 18.07,178.079 18.511,178.52 19.011,178.52 19.136,178.645 20.388,178.645 21.02,178.013 21.02,177.47 J2.B8@21.045,177.445
SCLK: J3.4 J16.1 R10.1 U13.13 | length 18.7
  Top Layer w0.25: R10.1@52.4,167.1 56.355,167.1 59,164.455 J16.1@59,153.5
USB+: D1.4 U3.14 | length 17.7
  Top Layer w0.25: D1.4@18.35,171.45 18.35,171.15 19.75,169.75 20.434,169.75 29.084,161.1 30.202,161.1 30.225,161.078 31.128,161.078 U3.14@31.453,160.753
USB-: D1.6 U3.13 | length 15.7
  Top Layer w0.25: D1.6@20.25,171.45 20.25,170.5 28.705,162.045 31.43,162.045 U3.13@31.453,162.023
USB_5V: D1.5 F2.1 J2.A4-B9 J2.B4-A9 J19.1 | length 42.9
  Top Layer w0.5: J2.B4-A9@16.895,177.445 16.945,177.495 16.945,178.105 17.08,178.24 17.08,178.33 17.92,179.17 20.606,179.17 21.51,178.266 21.51,178.24 21.645,178.105 21.645,177.495 J2.A4-B9@21.695,177.445 21.698,177.442 21.698,175.402 v3(21.7,175.4) 21.7,173.4 20.7,172.4 19.805,172.4 19.6,172.195 19.6,172.05 19.35,171.8 19.35,171.5 D1.5@19.3,171.45 ; v3(100.75,154.017) F2.1@102.25,154.017
  Bottom Layer w0.25: v3(100.75,154.017) 106.051,159.318 115.551,159.318 121.805,165.572 121.805,166.322 J19.1@122,166.517
USB_D_N: D1.1 J2.A7 J2.B7 | length 6.1
  Top Layer w0.25: J2.A7@19.045,177.445 19.07,177.47 19.07,177.895 19.17,177.995 19.17,178.113 19.302,178.245 19.788,178.245 20.02,178.013 20.02,177.895 20.045,177.87 20.045,174.255 20.25,174.05 D1.1@20.25,173.75
USB_D_P: D1.3 J2.A6 J2.B6 | length 5.6
  Top Layer w0.25: D1.3@18.35,173.75 18.52,173.92 J2.B6@18.52,177.02 ; J2.B6@18.545,177.445 18.545,177.02 18.67,176.895 18.67,176.777 18.802,176.645 19.288,176.645 19.42,176.777 19.42,176.895 19.545,177.02 J2.A6@19.545,177.445
pads on no net: J2. J3.9 J18.S1 J18.S2 U3.8 U3.10 U3.11 U3.15 U3.16 U3.20 U3.21 U3.22 U3.23 U3.24 U3.25 U3.26 U3.28 U3.29 U4.4 U4.5 U13.9 U13.10 U13.11 U13.V U14A.8 U14A.V U14B.8 U14B.V U14C.8 U14C.V U14D.8 U14D.V U14E.8 U14E.V U16.4 U16.5
copper on no net:
  other v7: 91,142

## Polygon pours and split planes (outlines as drawn)
5V on Top Layer "5V_L01_P002" (solid, pour order 2): 110,159.017 110,154.017 114.529,154.017 115.367,153.179 115.367,150.517 117,150.517 117,155.128 115.25,159.017
5V5_IN on Top Layer "5V5_IN_L01_P003" (solid, pour order 3): 103.25,167.017 107.75,167.017 107.75,169.267 106.75,170.267 104,170.267
5V5 on Top Layer "5V5_L01_P004" (solid, pour order 4): 105.25,166.017 103.75,166.017 103.75,159.267 107.5,159.267 107.5,163.767
3.3V on Top Layer "3.3V_L01_P009" (solid, remove dead copper, pour order 9): 129,150.517 129,165.517 114,165.517 114,150.517

## Other copper
Top Layer:
  region net GND: 106.675,161.842 107.5,161.842 107.5,162.767 106.675,162.767
  region net GND: 109.45,163.442 110.275,163.442 110.275,161.867 110.25,161.892 109.45,161.892
  region net GND: 114.5,169.017 119.75,169.017 119.75,166.017 114.5,166.017

## Silkscreen, mask and mechanical layers (free items; w line width, h text height)
Top Overlay:
  text "Inter 5V" at 124.674,169.889 h1.2
  text "5.5V IN" at 120.276,169.639 h1.2
  text "POWER" at 114.119,164.892 h1.5 r270
  text "USB 5V" at 120.137,163.882 h1.2
  text "5V" at 125.869,163.889 h1.2
  text "3.3V" at 120.922,157.887 h1.2
  text "GND" at 125.364,157.882 h1.2
  text "SCLK" at 57.282,151.021 h1.5
  text "MOSI" at 62.397,151.021 h1.5
  text "MISO" at 67.366,151.021 h1.5
  text "GND" at 72.583,151.021 h1.5
Mechanical 1:
  lines w0.1: 79,150.517 129,150.517 129,175.517 119,175.517 119,185.517 79,185.517 79,150.517
  lines w0.254: 4.032,65.071 ccw(c9.032,65.071) 9.032,60.071 124.032,60.071 ccw(c124.032,65.071) 129.032,65.071 129.032,180.071 ccw(c124.032,180.071) 124.032,185.071 9.032,185.071 ccw(c9.032,180.071) 4.032,180.071 4.032,65.071
Board Shape:
  lines w0.254: 4,150 79,150 79,185 14,185 14,175 4,175 4,150

## Text inside footprints (layer, text, board x,y; h text height)
R37A: Top Overlay "*" at 17.698,149.337 h1.27; Mechanical 13 "*" at 19.108,148.156 h1.27
R37B: Top Overlay "*" at 17.698,137.337 h1.27; Mechanical 13 "*" at 19.108,136.156 h1.27
R37C: Top Overlay "*" at 39.698,149.337 h1.27; Mechanical 13 "*" at 41.108,148.156 h1.27
R37D: Top Overlay "*" at 39.698,137.337 h1.27; Mechanical 13 "*" at 41.108,136.156 h1.27
R37E: Top Overlay "*" at 63.698,144.337 h1.27; Mechanical 13 "*" at 65.108,143.156 h1.27
U3: Mechanical 13 "ANTENNA" at 35.703,181.502 h1
U13: Top Overlay "Designator9" at 104.25,144.4 h1.27 r270
U15A: Top Overlay "REFDES" at 1.346,143.95 h1.27 r90; Top Overlay "RefDes" at 1.346,143.95 h1.27 r90; Mechanical 13 "RefDes2" at 3,142.95 h1.27 r90
U15B: Top Overlay "RefDes" at 1.346,132 h1.27 r90; Top Overlay "REFDES" at 1.346,132 h1.27 r90; Mechanical 13 "RefDes2" at 1.346,132 h1.27 r90
U15C: Top Overlay "RefDes" at 30.619,144.045 h1.27 r90; Top Overlay "REFDES" at 30.619,143.728 h1.27 r90; Mechanical 13 "RefDes2" at 30.619,143.728 h1.27 r90
U15D: Top Overlay "RefDes" at 30.518,132.095 h1.27 r90; Top Overlay "REFDES" at 30.518,131.778 h1.27 r90; Mechanical 13 "RefDes2" at 30.518,131.778 h1.27 r90
U15E: Top Overlay "RefDes" at 53.635,139.095 h1.27 r90; Top Overlay "REFDES" at 53.635,138.777 h1.27 r90; Mechanical 13 "RefDes2" at 53.635,138.777 h1.27 r90